# Altium PCB PCB2.PcbDoc
Units mm, origin at the board's own origin, x right, y up, seen from the top; angles counter-clockwise.
Board outline 157.25 x 130.25 mm, 2 copper layers (Top Layer, Bottom Layer); 13 components, 8 nets, 31 pads, 0 vias.
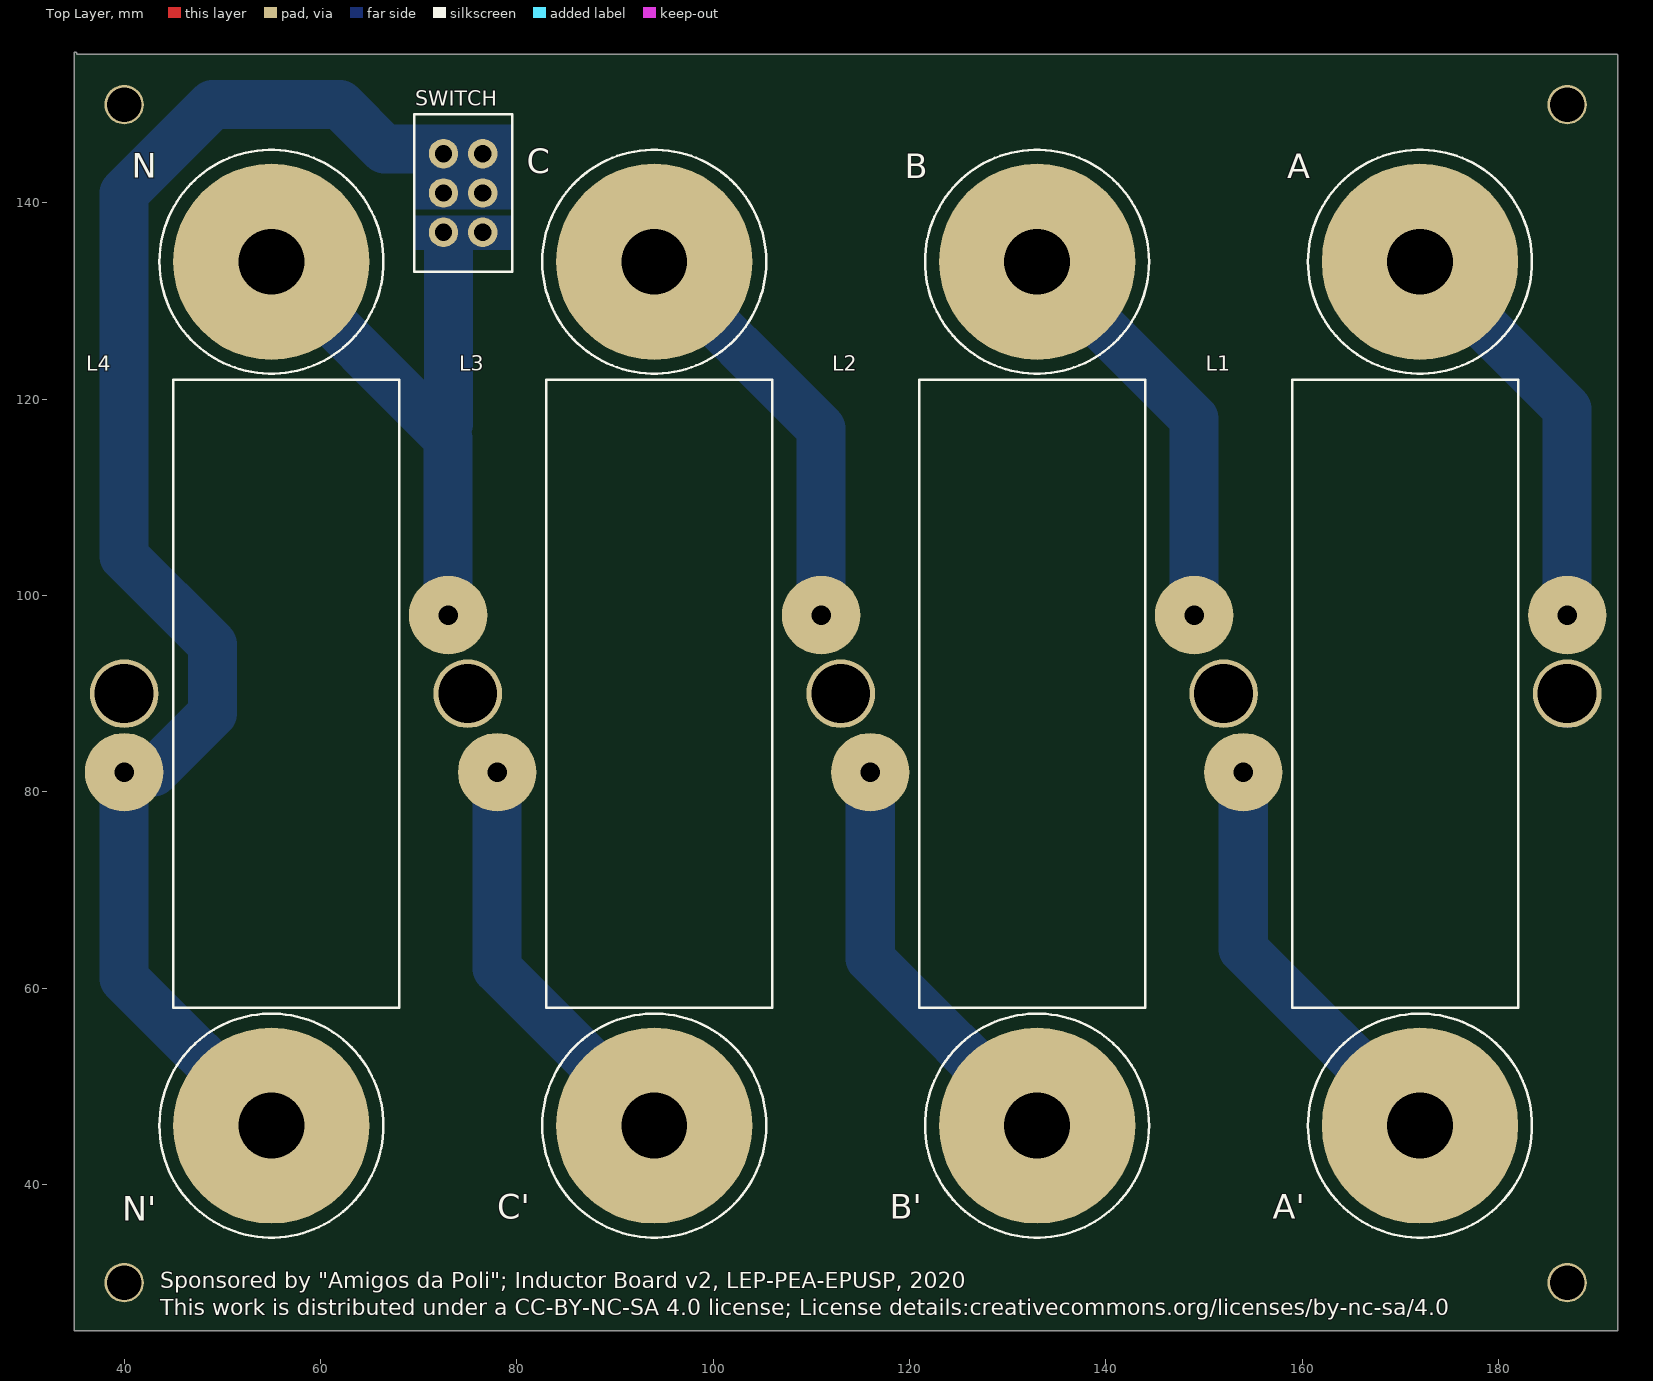
[diagram p0: Top Layer view]
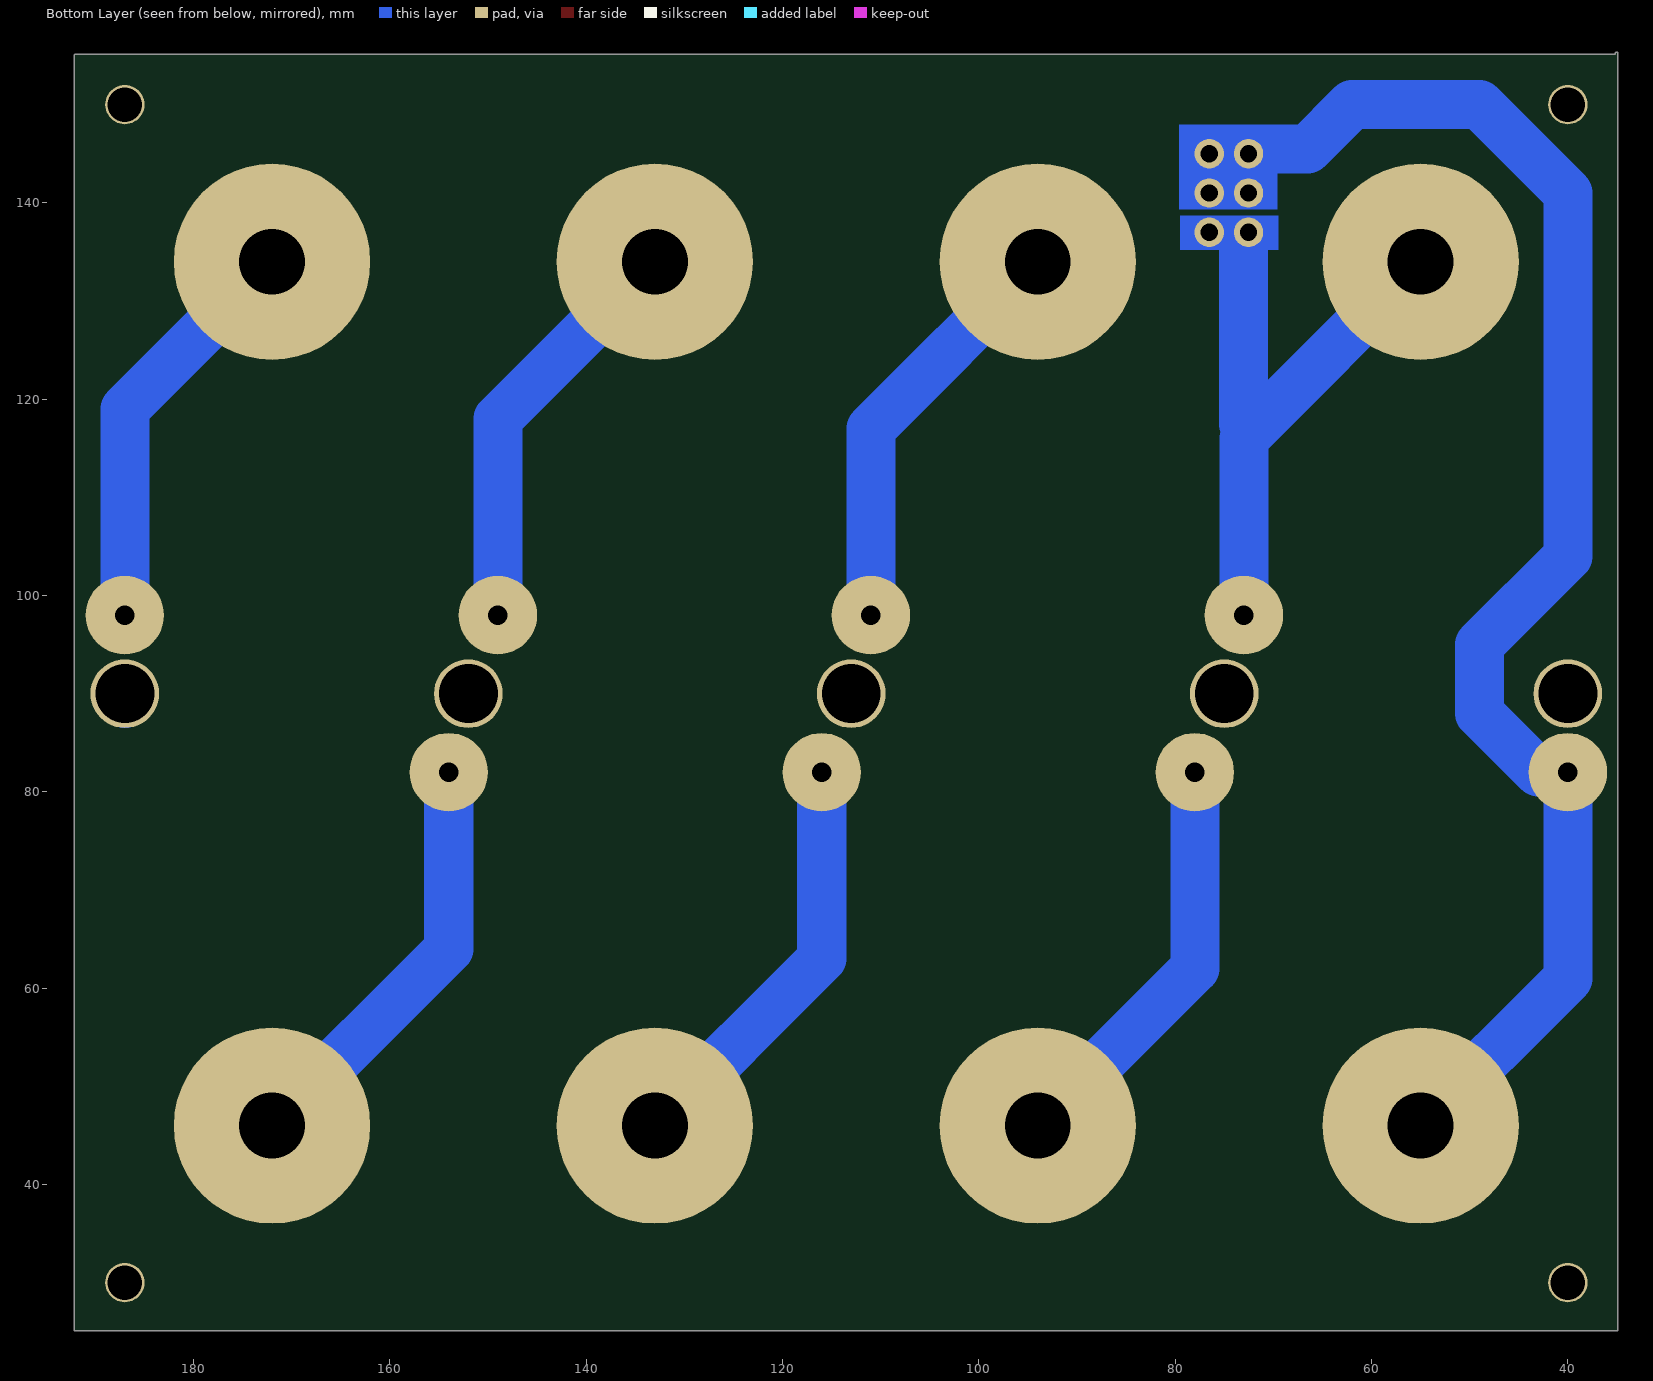
[diagram p1: Bottom Layer view, seen from below]

## Layer stack, top to bottom
Top Solder: solder mask 0.0102, Solder Resist, Dk 3.5
Top Layer: signal copper 0.0356
Dielectric 1: dielectric 0.32, FR-4, Dk 4.8
Bottom Layer: signal copper 0.0356
Bottom Solder: solder mask 0.0102, Solder Resist, Dk 3.5

## Board outline
34.906,25.222 ccw(c35.033,25.222) 35.033,25.095 192.033,25.095 ccw(c192.033,25.222) 192.16,25.222 192.16,155 ccw(c192.033,155) 192.033,155.127 35.16,155.127 35.16,155.222 ccw(c35.033,155.222) 34.906,155.222

## Design rules (kind name [scope] priority, off if disabled: settings)
Clearance Clearance_1 [All] p1: gap=0.5
Clearance [All] p2: gap=0.254
ComponentClearance [All] p1 off: gap=0.254 collisioncheckmode=3 verticalgap=0.254 showdistances=FALSE
PlaneConnect PlaneConnect_1 [All] p1: planeconnectstyle=Relief reliefexpansion=0.508 reliefentries=4 reliefconductorwidth=0.254 reliefairgap=0.254
PlaneConnect [All] p2: planeconnectstyle=Relief reliefexpansion=0.508 reliefentries=4 reliefconductorwidth=2 reliefairgap=0.254
PolygonConnect [All] p1: connectstyle=Relief reliefconductorwidth=2 reliefentries=4 polygonreliefangle="90 Angle" airgapwidth=0.254
RoomDefinition Sheet2 [InComponentClass('Sheet2')] p1: confinementstyle=ConfineIn formatcopy=TRUE lockcomponents=FALSE outline 35,25 192,25 192,155 35,155
RoutingVias [All] p1: holewidth=0.711 width=1.27 viastyle="Through Hole" minholewidth=0.711 minwidth=1.27 maxholewidth=0.711 maxwidth=1.27
SolderMaskExpansion [All] p1: expansion=0.102
Width [All] p1: maxlimit=10 minlimit=0.254 preferedwidth=5
28 further rules are at their usual default settings.

## Components (designator, comment, footprint, x,y, rotation, side; value= is the part's Value field where it differs from the comment)
A "Socket" PCBComponent_1#1 163.11,125.618 r0 top
A' "Socket" PCBComponent_1#1 163.11,37.618 r0 top
B "Socket" PCBComponent_1#1 124.11,125.618 r0 top
B' "Socket" PCBComponent_1#1 124.11,37.618 r0 top
C "Socket" PCBComponent_1#1 85.11,125.618 r0 top
C' "Socket" PCBComponent_1#1 85.11,37.618 r0 top
L1 "Inductor" PCBComponent_1#2 192,58 r90 top (schematic designator l1)
L2 "Inductor" PCBComponent_1#2 154,58 r90 top (schematic designator l2)
L3 "Inductor" PCBComponent_1#2 116,58 r90 top (schematic designator l3)
L4 "Inductor" PCBComponent_1#2 78,58 r90 top (schematic designator l4)
N "Socket" PCBComponent_1#1 46.11,125.618 r0 top
N' "Socket" PCBComponent_1#1 46.11,37.618 r0 top
SWITCH "SWITCH" PCBComponent_1#3 67.529,152.75 r270 top

## Footprints (in the part's own frame and the unit in brackets; to place one, negate y for a bottom-side part, rotate by r counter-clockwise, add the part's x,y. Pads: shape width x height; smd on the part's side, far side on the other; paste and mask are expansions set on the pad)
PCBComponent_1#1 [mm]
  round 20 hole 6.7: 1(8.89,8.382)
  silkscreen extent -2.52,-3.02 20.3,19.79
PCBComponent_1#2 [mm]
  round 8 hole 2: 1(24,38) 2(40,5)
  silkscreen extent 0,10 64,33
PCBComponent_1#3 [mm]
  round 3 hole 1.75: 1(7.75,9) 2(7.75,5) 3(11.75,9) 4(11.75,5) 5(15.75,9) 6(15.75,5)
  silkscreen extent 3.75,2 19.75,12

## Part data
SWITCH: library part CHAVE

## Free pads (board coordinates)
  round 4 hole 3.5: 10(40,150) 11(187,150) 12(187,30) 13(40,30)
  round 7 hole 6: 14(75,90) 15(40,90) 16(113,90) 17(152,90) 18(187,90)

## Nets (pads, with @x,y where several pads share a name; then routed paths per layer and width w, separated by ;. In a path a pad name is that pad's centre, name@x,y a point inside that pad or via, vN(x,y) a via of type N, cw(c..) or ccw(c..) an arc to the next point about the centre after c; other vN are vias at no path point)
Netl1_1: A'.1 L1.1 | length 43.5
  Bottom Layer w5: L1.1 154,64 A'.1
Netl1_2: A.1 L1.2 | length 42.2
  Bottom Layer w5: A.1 187,119 L1.2
Netl2_1: B'.1 L2.1 | length 43
  Bottom Layer w5: L2.1 116,63 B'.1
Netl2_2: B.1 L2.2 | length 42.6
  Bottom Layer w5: B.1 149,118 L2.2
Netl3_1: C'.1 L3.1 | length 42.6
  Bottom Layer w5: L3.1 78,62 C'.1
Netl3_2: C.1 L3.2 | length 52.9
  Bottom Layer w5: C.1@90.5,138.5 C.1@97.5,131.5 ; C.1 111,117 L3.2
Netl4_1: L4.1 N'.1 SWITCH.1 SWITCH.2 SWITCH.3 SWITCH.4 | length 154.5
  Bottom Layer w2: 71.029,141 71.029,145.5
  Bottom Layer w5: N'.1 40,61 L4.1 43,82 49,88 49,95 40,104 40,141 49,150 62,150 66.5,145.5 71.029,145.5 74,145.5
Netl4_2: L4.2 N.1 SWITCH.5 SWITCH.6 | length 61
  Bottom Layer w5: N.1 73,116 L4.2 ; 73.029,117.471 73.029,135
copper on no net: | length 10.8
  Bottom Layer w0.254: 185,90 189,90 187,92 187,89
  Bottom Layer w5: 187,89 187,90

## Other copper
Bottom Layer:
  rectangle net Netl4_1: 69.6,139.3 79.6,148
  rectangle net Netl4_2: 69.5,135.2 79.5,138.7

## Silkscreen, mask and mechanical layers (free items; w line width, h text height)
Top Overlay:
  text "Sponsored by \"Amigos da Poli\"; Inductor Board v2, LEP-PEA-EPUSP, 2020 / This work is distributed under a CC-BY-NC-SA 4.0 license; License details:creativecommons.org/licenses/by-nc-sa/4.0" at 43.7,26.1 h2.78
Mechanical 1:
  lines w0.254: 35.033,155 192.033,155 192.033,25.222 35.033,25.222 35.033,65.222 35.033,125.222 35.033,155.222